# Altium PCB PCB.PcbDoc (part 3 of 5)
Units mm, origin at the board's own origin, x right, y up, seen from the top; angles counter-clockwise.
Board outline 101.6 x 53.34 mm, 6 copper layers (Top Layer, Int1 (GND), Int2, Int3, Int4 (GND), Bottom Layer), stack 1.625 mm thick; 228 components, 228 nets, 1016 pads, 995 vias.
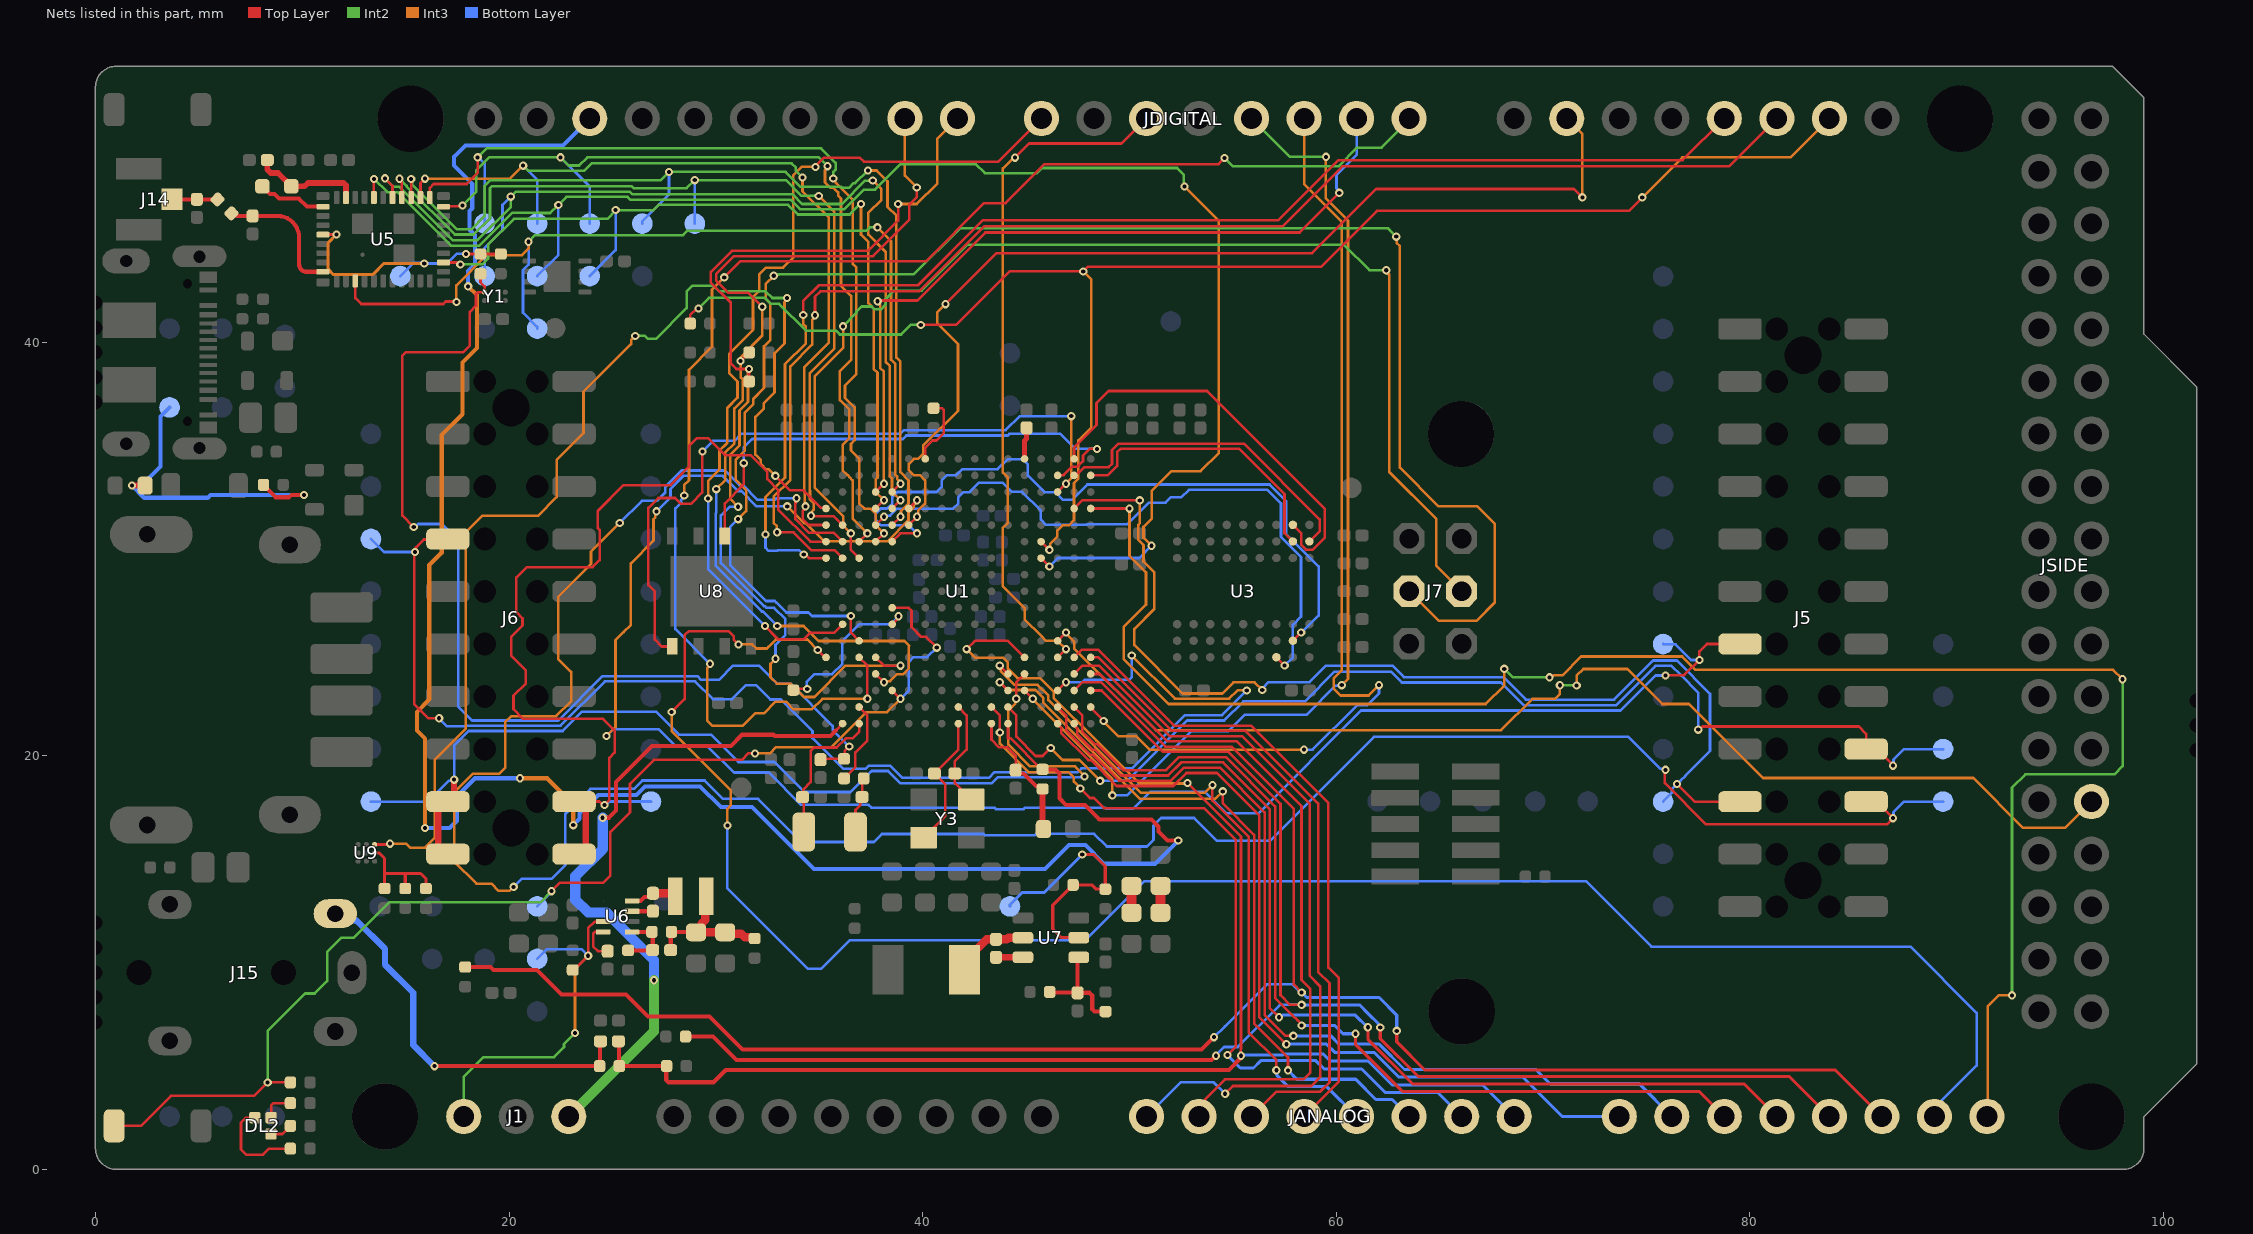
[diagram p7: the nets of this part, all layers, seen from the top]

## Via types
v1: diameter 0.4, hole 0.2, Top Layer to Bottom Layer, tented both sides, 995 vias

## Nets (pads, with @x,y where several pads share a name; then routed paths per layer and width w, separated by ;. In a path a pad name is that pad's centre, name@x,y a point inside that pad or via, vN(x,y) a via of type N, cw(c..) or ccw(c..) an arc to the next point about the centre after c; other vN are vias at no path point) (continued)
LEFT: JANALOG.22 R25.1 U1.T3 | length 97.2
  Top Layer w0.127: U1.T3@47.326,23.153 47.726,23.553 48.615,23.553 51.732,20.436 54.943,20.436 57.946,17.433 57.946,8.933 v1(58.326,8.553)
  Top Layer w0.15: v1(62.924,6.696) 62.924,6.163 64.291,4.796 84.142,4.796 JANALOG.22@86.386,2.553
  Top Layer w0.2: R25.1@17.878,9.784 19.103,9.784 19.243,9.644 21.343,9.644 22.528,8.459 25.653,8.459 26.722,7.39 29.697,7.39 31.297,5.79 53.49,5.79 v1(54.09,6.39)
  Bottom Layer w0.127: v1(54.09,6.39) 54.611,6.911 56.644,8.943 57.888,8.943 58.278,8.553 v1(58.326,8.553)
  Bottom Layer w0.15: v1(58.326,8.553) 58.575,8.305 62.075,8.305 62.924,7.455 v1(62.924,6.696)
M_7: C4.1 J15.2 R22.2 | length 19
  Top Layer w0.2: v1@16.389,4.989 24.371,4.989 R22.2@24.376,4.994 ; R22.2@24.38,4.99 24.4,5.01 24.4,6.17 C4.1@24.42,6.19
  Bottom Layer w0.3: J15.2@11.6,12.363 12.247,12.363 12.588,12.022 12.635,12.022 14,10.657 14,9.9 15.367,8.533 15.367,6.01 v1(16.389,4.988)
MEMS_32.768kHz: C72.1 R6.2 R9.1 Y1.2 | length 50.5
  Top Layer w0.127: v1(15.39,31.059) 14.843,31.606 14.843,39.348 14.999,39.505 17.763,39.505 18.1,39.841 18.1,41.461 18.4,41.761 18.4,42.318 18.497,42.415 Y1.2@18.819,42.415 18.819,42.692 18.619,42.892 R9.1@18.619,43.31 ; C72.1@35.065,19.805 35.104,19.844 35.646,19.844 35.649,19.847 36.097,19.847 36.225,19.975 36.225,20.225 v1(36.45,20.45)
  Bottom Layer w0.127: v1(15.39,31.059) 15.457,31.059 15.601,31.203 16.75,31.203 17.541,30.411 17.541,22.374 18.212,21.704 22.382,21.704 24.524,23.846 29.103,23.846 29.278,23.67 30.141,23.67 30.823,24.352 32.08,24.352 32.949,23.482 33.61,23.482 35.646,21.447 35.646,21.254 v1(36.45,20.45)
MIC: C4.2 JANALOG.16 R22.1 R23.2 U1.N5 | length 78.3
  Top Layer w0.127: v1(42.126,25.153) 42.53,25.557 44.122,25.557 U1.N5@44.922,24.757 ; v1(52.812,18.677) 55.394,16.095 55.394,5.824 55.382,5.812 55.382,5.497 v1(55.39,5.49)
  Top Layer w0.2: C4.2@25.29,6.19 25.31,6.17 25.31,5.01 R22.1@25.33,4.99 27.532,4.99 27.6,4.921 27.6,4.326 27.717,4.209 29.878,4.209 30.478,4.809 54.809,4.809 55.371,5.371 v1@55.371,5.471
  Top Layer w0.3: v1@55.371,5.471 v1(55.39,5.49)
  Int3 w0.127: v1(42.126,25.153) 42.536,24.743 43.888,24.743 44.117,24.515 44.117,24.21 44.574,23.753 45.679,23.753 46.332,23.099 46.332,22.795 48.403,20.724 50.474,18.653 52.788,18.653 v1(52.812,18.677)
  Bottom Layer w0.15: v1(55.39,5.49) 55.43,5.53 57.415,5.53 57.457,5.573 59.374,5.573 59.707,5.239 61.54,5.239 62.702,4.077 67.081,4.077 JANALOG.16@68.606,2.553
Net3V3_EN_X: 3V3_EN.X J1.1 R30.2 U6.3 | length 18.2
  Top Layer w0.127: R30.2@23.178,9.679 v1(23.825,10.326) 23.825,10.662 23.825,11.658 24.146,11.979 U6.3@24.621,11.979
  Int2 w0.127: J1.1@17.806,2.553 17.806,4.457 18.772,5.423 22.172,5.423 22.655,5.906 22.655,6.054 v1(23.19,6.59)
  Int3 w0.127: v1(23.19,6.59) 23.19,9.691 v1(23.825,10.326)
  Bottom Layer w0.127: 3V3_EN.X@21.362,10.173 21.83,10.641 23.51,10.641 v1(23.825,10.326)
Net5V_EN_X: 5V_EN.X R35.2 R36.1 U7.2 | length 12.7
  Top Layer w0.15: U7.2@47.55,11.2 46.706,11.2 46.289,11.616 46.289,12.767 R36.1@47.275,13.753 48.181,13.753 48.387,13.547 R35.2@48.831,13.547 48.831,14.669 48.274,15.226 v1(47.718,15.226)
  Bottom Layer w0.15: 5V_EN.X@44.222,12.713 44.222,12.793 44.805,13.377 45.869,13.377 v1(47.718,15.226)
NetC20_1: C20.1 U7.6 | length 1.3
  Top Layer w0.3: C20.1@43.55,10.25 U7.6@44.85,10.25
NetC20_2: C20.2 L1.1 U7.5 | length 3.7
  Top Layer w0.4: L1.1@42.016,9.653 42.016,10.103 42.566,10.653 42.619,10.653 43.086,11.12 44.069,11.12 44.149,11.2 U7.5@44.85,11.2
NetC35_2: C35.2 U1.N17 | length 1.5
  Top Layer w0.25: U1.N17@44.926,34.353 44.926,35.227 45.026,35.327 C35.2@45.026,35.853
NetC36_2: C36.2 L4.2 R7.2 U1.L1 | length 6.6
  Top Layer w0.127: U1.L1@43.326,21.553 43.326,20.778 43.698,20.407 44.093,20.407 44.5,20 C36.2@44.5,19.3 ; L4.2@45.778,16.454 L4.2@45.8,16.476
  Top Layer w0.2: C36.2@44.5,19.3 44.658,19.142 44.883,19.142 45.485,18.54 45.65,18.54 R7.2@45.8,18.39
  Top Layer w0.3: L4.2@45.8,16.476 R7.2@45.8,18.39
NetC38_1: C38.1 R14.1 U5.41 | length 6.6
  Top Layer w0.2: R14.1@6.572,46.228 ccw(c6.881,46.538) 6.881,46.1 C38.1@7.6,46.1 8.807,46.1 cw(c8.807,45.06) 9.847,45.06 9.847,43.76 ccw(c10.207,43.76) 10.207,43.4 U5.41@11,43.4
NetC39_1: C39.1 J14.SIG R14.2 | length 2.2
  Top Layer w0.2: J14.SIG@3.731,46.932 ccw(c3.731,46.904) J14.SIG@3.703,46.904 C39.1@4.903,46.904 5.102,46.906 ccw(c5.129,47.104) 5.128,46.904 5.896,46.904 R14.2@5.9,46.9
NetC42_1: C42.1 L2.2 U5.31 | length 5.3
  Top Layer w0.28: C42.1@8.308,48.804 8.308,48.347 8.475,48.18 8.827,48.18 L2.2@9.475,47.532 10.107,47.532 10.271,47.696 11.999,47.696 12.115,47.58 U5.31@12.115,46.99
NetC43_1: C43.1 L3.1 U6.8 | length 2.3
  Top Layer w0.2: U6.8@25.871,12.979 26.359,12.979 26.547,13.168 26.726,13.168 C43.1@26.907,13.349
  Top Layer w0.4: C43.1@26.907,13.349 27.84,13.349 L3.1@27.988,13.201
NetC43_2: C43.2 U6.7 | length 1
  Top Layer w0.2: U6.7@25.871,12.479 C43.2@26.907,12.479
NetC47_1: C47.1 R15.1 R16.2 U6.5 | length 3.1
  Top Layer w0.2: R16.2@25.758,10.586 26.934,10.586 C47.1@26.947,10.599 26.947,11.439 R15.1@26.907,11.479 U6.5@25.871,11.479
NetC47_2: C47.2 C48.2 C49.2 L3.2 R15.2 R39.1 | length 7
  Top Layer w0.2: C47.2@27.817,10.599 27.817,11.439 R15.2@27.857,11.479 29.028,11.479 C49.2@29.045,11.462
  Top Layer w0.4: C49.2@29.045,11.462 C49.2@29.083,11.462 ; L3.2@29.488,13.201 29.488,12.053 29.317,11.882 29.317,11.695 C49.2@29.083,11.462 ; R39.1@31.874,11.162 31.819,11.217 31.399,11.217 31.222,11.394 30.519,11.394 C48.2@30.451,11.462 C49.2@29.083,11.462
NetC50_2: C50.2 U6.4 | length 2
  Top Layer w0.127: U6.4@24.621,11.479 24.154,11.479 24.079,11.404 24.079,10.758 24.292,10.546 C50.2@24.768,10.546
NetC51_1: C51.1 R8.1 Y2.2 | length 2.8
  Top Layer w0.127: Y2.2@36.75,16.31 36.75,17.378 36.982,17.61 36.982,17.912 C51.1@37.07,18 37.07,18.82 R8.1@37.15,18.9
NetC52_1: C52.1 U1.J2 Y3.3 | length 5.2
  Top Layer w0.127: U1.J2@41.726,22.353 42.126,21.953 42.126,20.302 41.556,19.732 C52.1@41.556,19.143 41.556,18.679 Y3.3@42.35,17.885
NetC53_1: C53.1 U1.C1 Y2.1 | length 7.2
  Top Layer w0.127: C53.1@34.195,18 34.25,17.945 Y2.1@34.25,16.31 ; C53.1@34.23,18 34.23,18.366 34.584,18.72 34.584,20.227 34.755,20.397 35.845,20.397 36.288,20.841 36.612,20.841 36.926,21.155 U1.C1@36.926,21.553
NetC54_1: C54.1 U1.J1 Y3.1 | length 6.7
  Top Layer w0.127: Y3.1@40.05,16.035 41.1,17.085 41.1,18.604 C54.1@40.561,19.143 41.726,20.308 U1.J1@41.726,21.553
NetC60_1: C60.1 C61.2 | length 1.3
  Top Layer w0.5: C60.1@51.5,12.403 C61.2@51.5,13.703
NetC65_1: C65.1 R31.2 R33.2 U7.1 | length 5.2
  Top Layer w0.2: R31.2@46.155,8.588 R31.2@46.142,8.575 46.162,8.555 47.472,8.555 C65.1@47.492,8.535 ; U7.1@47.55,10.25 47.492,10.192 C65.1@47.492,8.535 ; R33.2@48.842,7.625 48.317,7.625 48.2,7.742 48.2,8.4 48.065,8.535 C65.1@47.492,8.535
NetC68_1: C68.1 C69.2 | length 1.3
  Top Layer w0.5: C68.1@50.1,12.403 C69.2@50.1,13.703
NetDL1_C: DL1.C PWR_LED.X R10.2 | length 16.3
  Top Layer w0.2: R10.2@8.125,33.085 8.71,32.5 9.362,32.5 9.472,32.61 v1(10.086,32.61)
  Top Layer w0.3: v1(1.767,33.062) DL1.C@2.4,33.062
  Bottom Layer w0.2: PWR_LED.X@3.582,36.843 3.146,36.407 3.146,33.98 2.227,33.062 v1(1.767,33.062) 2.355,32.473 5.431,32.473 5.569,32.61 v1(10.086,32.61)
NetDL2_1: DL2.1 R12.1 | length 1.1
  Top Layer w0.15: DL2.1@8.495,1.705 9.045,1.705 R12.1@9.425,2.085
NetDL2_2: DL2.2 R13.1 | length 1.6
  Top Layer w0.127: DL2.2@8.495,2.495 8.495,3.095 8.6,3.2 R13.1@9.425,3.2
NetDL2_3: DL2.3 R11.1 | length 4.7
  Top Layer w0.127: DL2.3@7.705,2.495 7.273,2.495 7.037,2.259 7.037,0.963 7.29,0.71 8.11,0.71 8.4,1 R11.1@9.425,1
NetJ1_3: J1.3 U1.B1 | length 33.1
  Top Layer w0.127: 35.799,21.22 35.799,21.225 U1.B1@36.122,21.549
  Top Layer w0.2: v1(24.525,17) 24.527,17.002 24.825,17.002 25.166,17.343 25.166,18.728 26.913,20.475 30.733,20.475 31.271,21.013 32.79,21.013 32.845,20.959 35.537,20.959 35.799,21.22
  Int2 w0.5: J1.3@22.886,2.553 27.009,6.676 v1(27.009,9.139)
  Bottom Layer w0.5: v1(24.525,17) 24.525,15.486 23.207,14.167 23.207,13.037 23.823,12.421 24.705,12.421 27.009,10.116 v1(27.009,9.139)
NetJDIGITAL_3: JDIGITAL.3 R7.1 U1.M1 | length 97.4
  Top Layer w0.127: U1.M1@44.126,21.553 44.126,20.851 44.239,20.851 R7.1@45.75,19.34
  Top Layer w0.2: R7.1@45.75,19.34 46.414,19.34 46.611,19.143 46.611,17.943 46.942,17.613 47.842,17.613 48.542,16.913 51.063,16.913 51.412,16.564 51.412,16.327 51.841,15.898 52.36,15.898 v1(52.362,15.897)
  Int3 w0.2: v1(15.932,16.5) 15.932,20.823 15.542,21.213 15.542,22.113 16.142,22.713 16.142,29.213 16.742,29.813 16.742,35.513 17.742,36.513 17.742,39.013 18.442,39.713 18.442,42.276 v1(18.021,42.696) ; v1(20.529,18.91) 21.844,18.91 23.101,17.653 v1(23.101,16.64)
  Bottom Layer w0.2: v1(15.932,16.5) 17.129,16.5 17.471,16.842 17.471,18.032 18.349,18.91 v1(20.529,18.91) ; v1(18.021,42.696) 18.021,43.432 18.349,43.76 18.349,45.177 18.095,45.432 18.095,46.346 18.221,46.473 18.221,47.648 17.334,48.535 17.334,48.961 17.886,49.513 22.602,49.513 JDIGITAL.3@23.902,50.813 ; v1(23.101,16.64) 23.41,16.949 23.41,17.202 24.315,18.107 26.162,18.107 26.568,18.513 29.242,18.513 30.242,17.513 31.742,17.513 34.742,14.513 45.913,14.513 47.077,15.677 47.871,15.677 48.775,14.773 51.238,14.773 v1(52.362,15.897)
NetL2_1: L2.1 U5.34 | length 3.3
  Top Layer w0.2: L2.1@8.075,47.532 8.447,47.16 8.652,47.16 8.867,46.946 9.827,46.946 10.222,46.55 U5.34@11,46.55
NetLPO_IN_X: LPO_IN.X R9.2 R40.2 U5.37 | length 12.8
  Top Layer w0.127: v1(17.922,44.265) 17.925,44.263 18.616,44.263 R9.2@18.619,44.26 R40.2@19.6,44.26
  Top Layer w0.15: U5.37@11,45.2 v1(11.65,45.2)
  Int3 w0.15: v1(11.65,45.2) 11.248,44.798 11.248,43.56 11.273,43.535 11.273,43.496 11.508,43.26 13.4,43.26 13.94,43.8 v1(15.9,43.8)
  Bottom Layer w0.127: LPO_IN.X@14.742,43.193 15.382,43.833 15.867,43.833 v1(15.9,43.8) 15.909,43.791 15.917,43.8 17,43.8 17.465,44.265 v1(17.922,44.265)
NetR3_2: R3.2 U1.E7 | length 7.9
  Top Layer w0.127: R3.2@33.776,23.146 33.858,23.229 v1(34.416,23.229) ; U1.E7@38.526,26.353 38.779,26.606 38.779,26.688 v1(38.831,26.741)
  Bottom Layer w0.127: v1(34.416,23.229) 34.399,23.245 34.399,23.578 34.764,23.943 35.617,23.943 36.117,24.444 36.117,25.544 36.926,26.353 38.444,26.353 v1(38.831,26.741)
NetR5_2: R5.2 U1.G17 | length 3.4
  Top Layer w0.127: U1.G17@40.126,34.353 40.126,34.905 40.464,35.243 40.669,35.243 41.011,35.586 41.011,36.726 40.935,36.803 R5.2@40.526,36.803
NetR6_1: R6.1 R8.2 U1.C2 | length 4.1
  Top Layer w0.127: R8.2@36.2,18.9 36.748,19.448 36.748,20.158 37.326,20.737 37.326,21.953 U1.C2@36.926,22.353
NetR32_2: R32.2 R34.2 R37.2 U9.C2 | length 5.4
  Top Layer w0.15: U9.C2@13.5,15.3 13.507,15.293 13.725,15.293 13.98,15.038 13.98,14.307 ; R37.2@13.98,13.575 13.98,14.307 ; R34.2@14.98,13.575 14.98,14.307 ; R32.2@15.98,13.575 15.98,14.051 15.724,14.307 14.98,14.307 ; 13.98,14.307 14.98,14.307
PA0_C: JANALOG.20 U1.T1 | length 48.6
  Top Layer w0.127: U1.T1@47.326,21.553 47.326,21.494 47.472,21.348 47.472,21.296 47.472,21.046 48.224,20.294 48.343,20.294 49.595,19.043 51.873,19.043 52.505,19.674 54.527,19.674 56.793,17.408 56.793,7.786 v1(57.226,7.353)
  Top Layer w0.15: v1(61.527,6.866) 61.527,6.296 63.701,4.123 79.735,4.123 JANALOG.20@81.306,2.553
  Bottom Layer w0.15: v1(57.226,7.353) 57.294,7.353 57.396,7.455 60.924,7.455 61.513,6.866 v1(61.527,6.866)
PA1: J6.17 J6.19 POWER_EN.X U1.N4 | length 52.2
  Top Layer w0.127: v1(44.526,22.753) 44.526,23.553 U1.N4@44.922,23.949
  Top Layer w0.3: J6.19@17.042,15.239 16.926,15.239 16.574,15.591 16.574,17.427 16.926,17.779 17.342,17.779 17.342,18.839 v1(17.343,18.841)
  Int3 w0.127: v1(44.526,22.753) 44.474,22.701 44.474,22.511 44.141,22.178 44.141,20.537 45.195,19.482 47.368,19.482 47.831,19.02 v1(47.831,18.994)
  Bottom Layer w0.127: POWER_EN.X@13.322,17.779 16.072,17.779 17.09,18.796 17.299,18.796 v1(17.343,18.841) 17.343,20.499 18.04,21.196 22.593,21.196 23.524,22.127 27.108,22.127 28.22,21.015 29.763,21.015 31.085,19.692 32.83,19.692 34.278,18.245 36.512,18.245 37.528,19.26 38.329,19.26 38.915,18.674 43.346,18.674 43.625,18.953 47.79,18.953 v1(47.831,18.994)
PA1_C: JANALOG.19 U1.T2 | length 46.4
  Top Layer w0.127: U1.T2@47.326,22.353 47.726,21.953 47.726,21.151 48.329,20.548 48.448,20.548 49.7,19.297 51.768,19.297 52.399,19.928 54.673,19.928 57.047,17.554 57.047,8.28 57.883,7.443 57.888,7.443 58.117,7.215 58.117,7.21 58.326,7.001 v1(58.326,6.953)
  Top Layer w0.15: v1(60.926,6.553) 60.926,6.048 63.219,3.754 77.564,3.754 JANALOG.19@78.766,2.553
  Bottom Layer w0.15: v1(58.326,6.953) 59.929,6.953 60.329,6.553 v1(60.926,6.553)
PA2: JDIGITAL.15 U1.N3 | length 50.6
  Top Layer w0.127: U1.N3@44.926,23.153 v1(45.326,22.753)
  Int2 w0.127: JDIGITAL.15@55.906,50.813 57.759,48.96 v1(59.504,48.96)
  Int3 w0.127: v1(45.326,22.753) 45.326,22.723 49.173,18.876 v1(49.173,18.083) ; v1(59.504,48.96) 59.499,48.955 59.499,46.949 60.566,45.883 60.566,23.713 v1(60.266,23.413)
  Bottom Layer w0.127: v1(49.173,18.083) 49.891,18.083 53.004,21.196 54.792,21.196 55.574,21.978 58.553,21.978 59.966,23.39 60.243,23.39 v1(60.266,23.413)
PA3: JDIGITAL.16 U1.U2 | length 47.4
  Top Layer w0.127: U1.U2@48.126,22.353 48.126,22.328 48.751,21.703 v1(48.751,21.678)
  Int3 w0.127: v1(48.751,21.678) 48.751,21.652 49.457,20.946 50.316,20.946 50.969,20.293 v1(58.44,20.293) ; JDIGITAL.16@58.446,50.813 58.446,47.644 60.266,45.824 60.266,24.113 59.875,23.722 59.875,23.251 60.213,22.913 61.566,22.913 v1(62.066,23.413)
  Bottom Layer w0.127: v1(58.44,20.293) 58.849,20.293 60.992,22.437 61.486,22.437 62.066,23.017 v1(62.066,23.413)
PA4: JANALOG.21 R24.1 U1.U3 | length 81.4
  Top Layer w0.127: U1.U3@48.126,23.153 48.656,23.153 51.627,20.182 54.793,20.182 57.305,17.671 57.305,8.418 57.769,7.953 v1(58.326,7.953)
  Top Layer w0.15: v1(62.126,6.853) 62.126,6.32 63.957,4.488 81.91,4.488 JANALOG.21@83.846,2.553
  Top Layer w0.2: R24.1@28.535,6.419 29.868,6.419 30.997,5.29 53.966,5.29 v1@54.166,5.49
  Top Layer w0.3: v1@54.166,5.49 v1(54.19,5.49)
  Bottom Layer w0.127: v1(54.19,5.49) 54.19,5.531 54.574,5.915 55.236,5.915 57.274,7.953 v1(58.326,7.953)
  Bottom Layer w0.15: v1(58.326,7.953) 61.126,7.953 61.555,7.524 62.026,7.054 62.026,7.02 62.126,6.92 v1(62.126,6.853)
PA6: J6.7 PCLK.X U1.R3 | length 69.6
  Top Layer w0.127: v1(16.619,21.81) 16.095,21.81 15.413,22.492 15.413,29.813 15.502,29.902 15.502,30.079 15.876,30.452 J6.7@17.316,30.452 ; U1.R3@46.526,23.153 v1(46.926,23.553)
  Int3 w0.127: v1(50.11,24.842) 52.197,22.755 54.825,22.755 55.23,23.16 55.665,23.16 v1(55.672,23.153)
  Bottom Layer w0.127: PCLK.X@13.322,30.479 13.951,29.85 v1(15.45,29.85) ; v1(16.619,21.81) 16.619,21.808 17.007,21.42 17.904,21.42 17.934,21.45 22.487,21.45 24.629,23.592 28.997,23.592 29.854,22.735 30.789,22.735 31.463,23.409 31.945,23.409 32.634,22.72 33.151,22.72 34.675,21.196 34.675,20.851 36.152,19.374 37.251,19.374 37.396,19.519 38.429,19.519 39.021,18.928 43.198,18.928 43.477,19.207 47.492,19.207 47.669,19.385 50.115,19.385 52.688,21.958 54.477,21.958 v1(55.672,23.153) ; v1(46.926,23.553) 47.734,23.553 47.855,23.674 49.998,23.674 50.11,23.786 v1(50.11,24.842)
PA7: JDIGITAL.13 U1.R5 | length 33.5
  Top Layer w0.127: v1(44.461,48.919) 45.143,49.601 49.614,49.601 JDIGITAL.13@50.826,50.813 ; U1.R5@46.526,24.753 v1(46.926,25.153)
  Int3 w0.127: v1(44.461,48.919) 44.407,48.919 43.882,48.393 43.882,33.687 44.117,33.452 44.117,31.255 43.872,31.01 43.872,28.208 44.936,27.143 44.936,26.591 45.736,25.791 45.974,25.553 46.526,25.553 v1(46.926,25.153)
PA8: U1.E15 U5.3 UART7_RX.X | length 46.4
  Top Layer w0.127: U5.3@12.565,42.96 12.565,42.135 12.856,41.844 16.819,41.844 16.936,41.961 17.434,41.961 v1(17.453,41.943) ; U1.E15@38.526,32.753 v1(38.926,33.153)
  Int2 w0.127: v1(20.943,44.851) 21.265,45.173 28.415,45.173 28.63,45.388 37.284,45.388 37.444,45.548 v1(37.81,45.548)
  Int3 w0.127: v1(17.453,41.943) 17.453,42.749 18.907,44.204 20.63,44.204 20.943,44.516 v1(20.943,44.851) ; v1(37.81,45.548) 38.469,44.89 38.469,39.151 38.667,38.954 38.667,33.605 38.771,33.502 38.771,33.382 38.926,33.227 v1(38.926,33.153)
  Bottom Layer w0.127: v1(20.943,44.851) 20.943,43.751 20.671,43.479 20.671,41.427 21.362,40.737 UART7_RX.X@21.362,40.653
PA9: JDIGITAL.17 U1.D15 | length 38.1
  Top Layer w0.127: U1.D15@37.726,32.753 v1(38.126,33.153) ; v1(37.825,41.978) 37.856,42.009 39.742,42.009 43.033,45.3 58.227,45.3 v1(60.144,47.216)
  Int3 w0.127: v1(37.825,41.978) 37.825,41.904 37.944,41.785 37.944,38.751 38.126,38.568 v1(38.126,33.153)
  Bottom Layer w0.127: v1(60.144,47.216) 60.144,47.29 60.009,47.425 60.009,48.076 60.986,49.052 JDIGITAL.17@60.986,50.813
PA10: BLE_ON.X U1.D14 U5.14 | length 41.4
  Top Layer w0.127: U5.14@16.83,43.85 17.418,43.85 cw(c17.418,43.53) 17.483,43.843 cw(c17.418,43.53) v1(17.644,43.756) ; U1.D14@37.726,31.953 v1(38.126,32.353)
  Int2 w0.127: v1(17.644,43.756) 18.711,43.756 18.992,44.037 18.992,44.727 20.228,45.963 24.757,45.963 25.155,46.362 v1(25.155,46.386) 25.173,46.368 26.965,46.368 27.235,46.638 33.498,46.638 33.965,46.172 36.471,46.172 36.977,46.678 v1(37.016,46.678)
  Int3 w0.127: v1(37.016,46.678) 37.016,45.2 37.369,44.846 37.369,41.881 37.634,41.616 37.634,38.701 37.817,38.518 37.817,33.448 37.723,33.354 37.723,32.756 v1(38.126,32.353)
  Bottom Layer w0.127: BLE_ON.X@23.902,43.193 25.155,44.446 v1(25.155,46.386)
PA15: U1.A14 U9.C3 | length 55.1
  Top Layer w0.127: v1(32.878,33.532) 33.571,32.838 34.224,32.838 35.079,31.983 35.296,31.983 U1.A14@35.326,31.953
  Top Layer w0.15: U9.C3@13.5,15.7 14.194,15.7 v1(14.24,15.746)
  Int2 w0.127: v1(26.1,40.3) 26.566,40.3 26.707,40.159 27.099,40.159 28.583,41.644 28.583,42.436 28.877,42.729 29.871,42.729 30.142,42.458 32.408,42.458 32.733,42.133 v1(33.438,42.133)
  Int3 w0.127: v1(14.24,15.746) 15.024,15.746 15.217,15.553 15.933,15.553 16.4,16.02 16.4,19.8 17.9,21.3 17.9,30.8 18.7,31.6 21.4,31.6 22.3,32.5 22.3,34.3 23.6,35.6 23.6,37.6 25.9,39.9 25.9,40.1 v1(26.1,40.3) ; v1(32.878,33.532) 32.564,33.846 32.434,33.846 32.172,34.107 32.172,34.3 31.906,34.567 31.906,36.375 32.316,36.786 32.316,37.05 32.838,37.572 32.838,39.459 33.32,39.941 33.32,41.941 33.438,42.059 v1(33.438,42.133)
PB0: JANALOG.11 U1.U5 | length 32.1
  Top Layer w0.127: U1.U5@48.126,24.753 48.493,24.753 52.048,21.198 55.611,21.198 59.122,17.687 59.122,9.551 59.672,9 59.672,4.199 59.226,3.753 57.106,3.753 JANALOG.11@55.906,2.553
PB1: JANALOG.12 U1.T5 | length 31.6
  Top Layer w0.127: U1.T5@47.326,24.753 47.702,25.128 48.477,25.128 52.153,21.452 55.886,21.452 59.622,17.717 59.622,9.751 60.126,9.246 60.126,4.233 JANALOG.12@58.446,2.553
PB2: JSIDE.28 U1.R6 | length 57.8
  Top Layer w0.127: U1.R6@46.526,25.553 v1(46.926,25.953)
  Int2 w0.127: v1(70.812,23.408) 70.817,23.404 71.62,23.404 v1(71.625,23.399)
  Int3 w0.127: v1(46.926,25.953) 46.926,25.904 47.339,25.491 47.339,25.171 51.279,21.231 67.97,21.231 69.491,22.752 70.578,22.752 70.812,22.985 v1(70.812,23.408) ; v1(71.625,23.399) 71.625,23.868 71.95,24.193 74.076,24.193 75.77,22.499 77.055,22.499 80.635,18.919 90.805,18.919 93.215,16.509 95.25,16.509 JSIDE.28@96.52,17.779
PB3: J7.3 U1.C6 | length 80.8
  Top Layer w0.127: v1(36.526,26.753) 36.526,25.953 U1.C6@36.926,25.553
  Int2 w0.127: v1(32.802,43.208) 32.854,43.26 33.035,43.26 33.05,43.275 39.569,43.275 41.798,45.505 62.502,45.505 62.577,45.43 62.577,45.423 v1(62.9,45.1)
  Int3 w0.127: v1(31.076,31.438) 31.467,31.828 31.467,32.837 30.955,33.348 30.955,34.308 31.398,34.751 31.398,36.586 31.808,36.996 31.808,37.261 32.33,37.782 32.33,39.794 32.632,40.096 32.632,41.874 32.42,42.087 32.42,42.826 v1(32.802,43.208) ; v1(62.9,45.1) 62.918,45.082 62.918,44.8 63.072,44.646 63.072,33.936 64.954,32.054 66.827,32.054 67.664,31.216 67.664,27.396 66.797,26.529 64.949,26.529 J7.3@63.526,27.953
  Bottom Layer w0.127: v1(31.076,31.438) 30.69,31.052 30.69,29.224 32.433,27.482 32.846,27.482 32.921,27.407 32.924,27.407 33.407,26.924 34.48,26.924 34.651,26.753 v1(36.526,26.753)
PB4: JDIGITAL.11 U1.B7 | length 43.1
  Top Layer w0.127: v1(32.372,26.273) 33.017,25.628 34.247,25.628 34.563,25.943 35.717,25.943 U1.B7@36.126,26.353 ; v1@34.8,48.5 35.213,48.913 36.966,48.913 37.152,48.726 43.659,48.726 JDIGITAL.11@45.746,50.813
  Int3 w0.127: v1(29.626,32.438) 29.626,33.289 30.177,33.84 30.177,34.754 30.551,35.127 30.551,36.816 31.046,37.312 31.046,38.094 30.643,38.497 30.643,39.428 31.797,40.583 31.797,42.172 32.093,42.467 32.093,43.265 32.427,43.599 33.249,43.599 33.75,44.1 33.75,48.071 34.152,48.473 v1(34.822,48.473)
  Bottom Layer w0.127: v1(29.626,32.438) 29.626,29.018 v1(32.372,26.273)
PB5: JANALOG.23 U1.A5 | length 93.7
  Top Layer w0.127: v1(27.863,22.113) 28.495,22.745 28.495,25.828 28.692,26.025 30.608,26.025 30.871,25.762 30.871,25.601 v1(31.09,25.383) ; v1(34.926,25.113) 35.285,24.753 U1.A5@35.326,24.753
  Int3 w0.127: 27.863,21.913 27.863,21.19 30.719,18.333 30.719,17.595 30.559,17.434 v1(30.559,16.622) ; v1(31.09,25.383) 31.758,25.383 31.959,25.181 32.461,25.181 32.537,25.257 32.542,25.257 32.903,25.618 34.42,25.618 v1(34.926,25.113)
  Bottom Layer w0.127: v1(30.559,16.622) 30.559,13.587 34.455,9.691 35.094,9.691 36.487,11.084 47.881,11.084 50.727,13.931 72.083,13.931 75.244,10.77 87.764,10.77 90.969,7.565 90.969,5.021 88.926,2.978 JANALOG.23@88.926,2.553
PB7: JDIGITAL.18 U1.C5 | length 70.7
  Top Layer w0.127: v1(30.405,43.132) 31.176,43.903 40.157,43.903 42.973,46.72 44.013,46.72 45.9,48.606 54.306,48.606 v1(54.6,48.9) ; U1.C5@36.926,24.753 37.326,24.353 v1(37.326,22.753)
  Int2 w0.127: v1(54.6,48.9) 55,48.5 60.1,48.5 61,49.4 62.19,49.4 63.526,50.735 JDIGITAL.18@63.526,50.813
  Int3 w0.127: v1(28.468,32.583) 28.468,33.086 28.698,33.316 28.698,38.66 29.816,39.778 29.816,42.543 v1(30.405,43.132) ; v1(29.718,24.446) 29.718,24.372 29.592,24.245 29.592,21.688 29.823,21.456 31.304,21.456 31.9,22.052 32.325,22.052 32.886,22.614 33.386,22.614 33.756,22.243 34.636,22.243 35.146,22.753 v1(37.326,22.753)
  Bottom Layer w0.127: v1(28.468,32.583) 28.468,32.517 28.315,32.364 28.315,32.227 28.041,31.954 28.041,26.122 v1(29.718,24.446)
PB8: JDIGITAL.10 R29.1 U1.D5 | length 49.7
  Top Layer w0.127: R29.1@31.61,38.098 31.605,38.104 31.605,38.695 v1(31.6,38.7) 30.99,38.7 30.723,38.967 30.723,41.903 29.76,42.865 29.76,43.399 30.773,44.411 37.35,44.411 38.816,45.878 v1(38.816,46.678) ; U1.D5@37.726,24.753 38.126,24.353 v1(38.926,24.353)
  Int3 w0.127: v1(31.076,32.038) 30.701,32.413 30.701,34.559 31.144,35.002 31.144,36.691 31.554,37.102 31.554,38.654 v1(31.6,38.7) ; v1(32.885,24.689) 32.642,24.445 32.642,23.79 32.949,23.482 33.61,23.482 34.254,22.838 34.764,22.838 36.278,24.353 v1(38.926,24.353) ; v1(38.816,46.678) 39.709,46.678 40.709,47.678 40.709,49.84 JDIGITAL.10@41.682,50.813
  Bottom Layer w0.127: v1(31.076,32.038) 30.667,32.038 30.242,31.613 30.242,29.314 32.328,27.228 32.376,27.228 32.451,27.153 32.819,27.153 33.362,26.609 33.362,25.837 32.885,25.36 v1(32.885,24.689)
PB9: JDIGITAL.9 R28.1 U1.D4 | length 47
  Top Layer w0.127: v1(31.187,39.09) 31.202,39.09 R28.1@31.61,39.498 ; v1(32.242,41.713) 31.561,42.393 30.592,42.393 30.014,42.97 30.014,43.294 30.878,44.157 37.596,44.157 39.349,45.91 39.349,46.641 39.716,47.009 v1(39.716,47.478) ; U1.D4@37.726,23.953 v1(38.126,23.553)
  Int3 w0.127: v1(30.017,32.888) 30.447,33.318 30.447,34.664 30.89,35.107 30.89,36.796 31.3,37.207 31.3,38.199 31.21,38.29 31.21,39.275 32.242,40.307 v1(32.242,41.713) ; v1(32.972,26.273) 34.242,26.273 34.971,25.544 39.123,25.544 39.344,25.323 39.336,25.315 39.336,24.762 39.336,24.21 39.069,23.943 38.764,23.943 38.426,23.605 38.178,23.605 v1(38.126,23.553) ; JDIGITAL.9@39.142,50.813 39.142,48.052 v1(39.716,47.478)
  Bottom Layer w0.127: v1(30.017,32.888) 30.017,31.748 29.988,31.718 29.988,29.208 32.222,26.974 32.271,26.974 v1(32.972,26.273)
PB10: U1.P11 U5.28 WIFI_ON.X | length 74.9
  Top Layer w0.127: U5.28@13.465,46.99 v1(13.465,47.89) ; U1.P11@45.726,29.553 v1(46.126,29.153)
  Int2 w0.127: v1(13.465,47.89) 13.479,47.89 14.113,47.256 14.602,47.256 17.194,44.664 18.565,44.664 20.15,46.249 21.613,46.249 21.62,46.242 21.991,46.242 v1(22.382,46.633) 22.772,47.023 25.727,47.023 25.858,46.892 33.604,46.892 34.07,46.426 36.212,46.426 37.154,47.368 37.695,47.368 38.94,48.613 42.566,48.613 43.006,48.173 45.526,48.173 45.771,48.418 52.302,48.418 52.628,48.092 52.628,47.559 v1(52.663,47.524)
  Int3 w0.127: v1(51.071,30.153) 50.681,30.543 50.681,31.062 51.071,31.453 51.071,32.8 52.028,33.757 53.436,33.757 54.324,34.645 54.324,45.863 v1(52.663,47.524)
  Bottom Layer w0.127: WIFI_ON.X@21.362,43.193 22.382,44.213 v1(22.382,46.633) ; v1(46.126,29.153) 46.536,29.562 50.481,29.562 v1(51.071,30.153)
PB11: JDIGITAL.25 R19.1 U1.P12 | length 76.1
  Top Layer w0.127: R19.1@28.76,40.898 28.76,41.308 29.082,41.63 v1(29.156,41.63) ; v1(39.91,40.83) 41.622,40.83 44.209,43.417 v1(47.767,43.417) 48.002,43.652 59.28,43.652 61.973,46.344 74.144,46.344 v1(74.8,47) ; U1.P12@45.726,30.353 v1(46.126,29.953)
  Int2 w0.127: v1(29.156,41.63) 29.665,42.139 32.368,42.139 32.661,41.846 33.055,41.846 34.351,40.55 35.81,40.55 35.994,40.367 38.958,40.367 39.422,40.83 v1(39.91,40.83)
  Int3 w0.127: v1(46.126,29.953) 46.178,30.005 46.178,30.253 46.517,30.591 46.517,30.896 46.764,31.143 47.069,31.143 47.317,31.391 47.317,33.188 47.528,33.399 47.528,35.245 48.154,35.871 48.154,43.031 v1(47.767,43.417) ; v1(74.8,47) 76.732,48.932 81.965,48.932 JDIGITAL.25@83.846,50.813
PB12: J5.19 PB12.X U1.T14 | length 52.5
  Top Layer w0.127: U1.T14@47.326,31.953 47.726,32.353 50.496,32.353 v1(50.501,32.348) ; v1(76.482,18.633) 77.336,17.779 J5.19@79.525,17.779
  Int3 w0.127: v1(50.501,32.348) 50.501,31.242 50.427,31.168 50.427,30.438 50.681,30.184 50.681,29.383 51.204,28.86 51.204,27.106 50.236,26.138 50.236,25.341 52.568,23.009 54.491,23.009 55.032,23.55 56.044,23.55 v1(56.422,23.173)
  Bottom Layer w0.127: v1(56.422,23.173) 56.422,23.247 56.735,23.56 58.704,23.56 59.501,24.357 62.712,24.357 63.271,23.798 68.081,23.798 69.165,22.713 73.435,22.713 75.323,24.602 76.466,24.602 78.074,22.993 78.074,20.226 76.879,19.03 76.879,19.027 76.651,18.798 76.647,18.798 v1(76.482,18.633) 76.236,18.388 76.236,18.21 PB12.X@75.805,17.779
PB13: JANALOG.24 U1.U14 | length 88.1
  Top Layer w0.127: U1.U14@48.126,31.953 49.996,31.953 v1(50.001,31.948)
  Int2 w0.127: v1(68.125,24.199) 68.537,23.787 v1(70.316,23.787) ; v1(92.677,8.41) 92.677,18.451 93.325,19.099 97.625,19.099 98.025,19.499 v1(98.025,23.699)
  Int3 w0.127: v1(50.001,31.948) 50.001,29.662 50.8,28.863 50.8,27.307 49.719,26.226 49.719,24.68 51.899,22.501 67.227,22.501 68.125,23.399 v1(68.125,24.199) ; v1(70.316,23.787) 70.39,23.787 70.492,23.89 70.929,23.89 71.838,24.799 76.725,24.799 77.371,24.153 97.571,24.153 v1(98.025,23.699) ; JANALOG.24@91.466,2.553 91.499,2.586 91.499,7.873 92.036,8.41 v1(92.677,8.41)
PC0: JANALOG.15 U1.L2 | length 38.8
  Top Layer w0.127: U1.L2@43.326,22.353 43.732,21.947 v1(43.732,21.126) ; v1(47.625,18.418) 48.089,17.954 48.278,17.954 48.77,17.462 53.601,17.462 55.14,15.924 55.14,5.929 v1(54.736,5.525)
  Int3 w0.127: v1(43.732,21.126) 43.732,20.587 45.111,19.208 47.05,19.208 47.311,18.946 47.311,18.753 47.625,18.439 v1(47.625,18.418)
  Bottom Layer w0.15: v1(54.736,5.525) 55.36,4.9 56.001,4.9 56.354,5.253 59.017,5.253 59.419,4.85 61.229,4.85 62.36,3.719 64.899,3.719 JANALOG.15@66.066,2.553
PC1: DFSDM1_DATIN0.X J5.18 U1.M2 | length 54.9
  Top Layer w0.127: U1.M2@44.126,22.353 44.526,21.953 44.526,20.923 45.466,19.983 45.805,19.983 v1(46.192,20.37) ; v1(77.504,21.26) 77.56,21.26 77.715,21.415 85.269,21.415 85.625,21.059 J5.18@85.625,20.319 ; J5.18@86.145,20.319 v1@86.925,19.539
  Int3 w0.127: v1(46.192,20.37) 46.768,19.794 47.584,19.794 48.583,18.794 v1(48.583,18.784)
  Bottom Layer w0.127: v1(48.583,18.784) 49.873,18.784 52.793,21.704 54.582,21.704 55.507,22.629 58.486,22.629 59.923,24.066 62.644,24.066 63.171,23.538 67.969,23.538 69.07,22.437 73.517,22.437 75.428,24.348 76.208,24.348 76.66,23.896 77.504,23.052 v1(77.504,21.26) ; v1(86.925,19.519) 86.946,19.54 86.946,19.819 87.446,20.319 DFSDM1_DATIN0.X@89.345,20.319 DFSDM1_DATIN0.X@89.327,20.3
PC2: JANALOG.14 U1.M3 | length 35.5
  Top Layer w0.127: v1(43.726,23.553) U1.M3@44.126,23.153 ; v1(54.512,18.277) 54.512,17.695 56.031,16.177 56.031,7.047 57.666,5.411 v1(57.666,4.784)
  Int3 w0.127: v1(43.726,23.553) 44.104,23.175 45.456,23.175 45.824,22.807 45.824,22.584 50.489,17.92 54.155,17.92 v1(54.512,18.277)
  Bottom Layer w0.15: v1(57.666,4.784) 58.097,4.353 60.937,4.353 61.914,3.376 62.702,3.376 JANALOG.14@63.526,2.553
PC2_C: JANALOG.17 U1.R1 | length 41.4
  Top Layer w0.127: U1.R1@46.526,21.553 46.526,21.543 46.697,21.372 46.697,21.103 48.013,19.786 48.133,19.786 49.384,18.535 52.118,18.535 52.749,19.166 54.235,19.166 56.285,17.116 56.285,7.345 v1(57.585,6.045)
  Bottom Layer w0.15: v1(57.585,6.045) 57.592,6.051 58.093,6.051 58.095,6.053 59.526,6.053 59.926,5.653 61.826,5.653 63.009,4.47 69.009,4.47 70.926,2.553 JANALOG.17@73.686,2.553
PC3: JANALOG.13 U1.M4 | length 33.8
  Top Layer w0.127: v1(43.726,24.353) U1.M4@44.126,23.953 ; v1(54.012,18.577) 54.012,17.836 55.777,16.071 55.777,6.602 57.104,5.275 v1(57.104,4.787)
  Int3 w0.127: v1(43.726,24.353) 43.771,24.308 43.771,24.1 44.442,23.429 45.562,23.429 46.078,22.912 46.078,22.689 50.563,18.205 53.64,18.205 v1(54.012,18.577)
  Bottom Layer w0.15: v1(57.104,4.787) 57.142,4.749 57.142,4.523 57.671,3.994 59.545,3.994 JANALOG.13@60.986,2.553
PC3_C: JANALOG.18 U1.R2 | length 44.6
  Top Layer w0.127: U1.R2@46.526,22.353 46.926,21.953 46.951,21.929 46.951,21.208 48.119,20.04 48.238,20.04 49.489,18.789 52.013,18.789 52.644,19.42 54.381,19.42 56.539,17.262 56.539,7.45 57.536,6.453 v1@57.915,6.453
  Bottom Layer w0.15: v1(57.926,6.453) 58.158,6.453 58.16,6.455 58.945,6.455 58.949,6.451 59.734,6.451 60.134,6.051 62.073,6.051 63.3,4.824 69.643,4.824 70.333,4.134 74.644,4.134 JANALOG.18@76.226,2.553
PC4: JANALOG.9 U1.T4 | length 37.4
  Top Layer w0.127: U1.T4@47.326,23.953 47.726,24.353 48.534,24.353 51.943,20.944 55.435,20.944 58.722,17.658 58.722,9.351 59.226,8.846 59.226,4.453 58.8,4.027 55,4.027 v1(54.626,3.653)
  Bottom Layer w0.127: JANALOG.9@50.826,2.553 52.476,4.203 54.076,4.203 v1(54.626,3.653)
PC5: JANALOG.10 U1.U4 | length 32.5
  Top Layer w0.127: U1.U4@48.126,23.953 48.575,23.953 51.838,20.69 55.189,20.69 58.322,17.558 58.322,9.151 58.745,8.728 58.745,4.671 58.418,4.345 54.618,4.345 53.667,3.393 53.667,2.854 JANALOG.10@53.366,2.553
PC6: I2S2_MCK.X J5.13 U1.F14 | length 91.5
  Top Layer w0.127: U1.F14@39.326,31.953 v1(39.726,32.353) ; v1(75.925,23.878) 75.943,23.896 76.823,23.896 v1(77.56,24.633) 77.56,25.036 77.923,25.399 J5.13@79.525,25.399
  Int3 w0.127: v1(24.715,20.95) 25.149,21.384 25.149,25.588 25.539,25.979 25.891,26.331 25.891,29.304 26.985,30.398 26.985,31.437 27.074,31.526 27.074,31.763 v1(27.126,31.816) ; v1(33.454,32.058) 34.275,31.237 34.37,31.237 35.244,30.362 38.288,30.362 39.317,31.391 39.317,31.75 39.571,32.004 39.571,32.124 39.726,32.279 v1(39.726,32.353)
  Bottom Layer w0.127: v1(24.715,20.95) 25.044,21.28 27.237,21.28 28.088,20.428 29.631,20.428 30.875,19.184 32.561,19.184 34.124,17.621 37.39,17.621 37.529,17.483 43.473,17.483 43.54,17.416 44.883,17.416 44.958,17.491 48.819,17.491 48.872,17.439 50.186,17.439 51.003,18.256 53.655,18.256 54.698,17.213 56.238,17.213 61.208,22.183 73.744,22.183 75.439,23.878 v1(75.925,23.878) ; v1(27.126,31.816) 27.807,32.496 27.807,32.898 28.446,33.537 30.325,33.537 31.065,32.797 31.235,32.797 31.975,32.058 v1(33.454,32.058) ; I2S2_MCK.X@75.805,25.399 75.816,25.388 76.405,25.388 77.166,24.627 77.554,24.627 v1(77.56,24.633)
PC7: JDIGITAL.20 U1.F13 | length 50.6
  Top Layer w0.127: U1.F13@39.326,31.153 v1(39.726,31.553) ; v1(41.105,41.837) 43.568,44.3 58.828,44.3 61.93,47.402 71.498,47.402 v1(71.9,47)
  Int3 w0.127: v1(39.726,31.553) 39.778,31.605 39.778,31.853 40.117,32.191 40.117,33.315 39.869,33.562 39.564,33.562 39.331,33.796 39.331,34.11 39.573,34.352 39.782,34.352 40.024,34.594 40.024,34.994 41.708,36.679 41.708,39.907 40.712,40.902 40.712,41.444 v1(41.105,41.837) ; JDIGITAL.20@71.146,50.813 71.9,50.058 v1(71.9,47)
PC8: SDIO_D0.X U1.E13 U5.24 | length 48.4
  Top Layer w0.127: U5.24@15.265,46.99 v1(15.265,47.89) ; U1.E13@38.526,31.153 v1(38.926,31.553)
  Int2 w0.127: v1@15.26,47.885 15.304,47.84 15.304,47.631 17.48,45.455 18.184,45.455 18.822,46.093 18.822,47.55 19.104,47.833 27.341,47.833 27.741,48.233 33.365,48.233 34.08,47.518 36.046,47.518 36.105,47.459 36.428,47.459 36.657,47.688 36.739,47.688 37.347,48.295 v1(37.353,48.295)
  Int3 w0.127: v1(37.353,48.295) 37.773,48.295 38.298,47.771 38.298,46.544 38.723,46.118 38.723,39.257 38.921,39.059 38.921,33.711 39.317,33.315 39.317,32.191 38.951,31.826 38.951,31.578 v1(38.926,31.553)
  Bottom Layer w0.127: SDIO_D0.X@26.442,45.733 26.442,45.845 27.735,47.138 v1(27.735,48.227)
PC9: SDIO_D1.X U1.E14 U5.26 | length 49.4
  Top Layer w0.127: v1(14.002,47.918) 14.365,47.556 U5.26@14.365,46.99 ; U1.E14@38.526,31.953 v1(38.926,32.353)
  Int2 w0.127: v1(14.002,47.918) 14.411,47.51 14.708,47.51 17.299,44.918 18.459,44.918 20.082,46.54 v1(20.082,47.033) 20.326,47.277 25.832,47.277 25.954,47.155 33.7,47.155 34.175,46.68 36.091,46.68 37.221,47.81 v1(37.585,47.81)
  Int3 w0.127: v1(37.585,47.81) 37.6,47.81 38.003,47.406 38.003,46.883 37.378,46.258 37.378,45.197 38.215,44.36 38.215,39.046 38.413,38.849 38.413,33.5 38.517,33.396 38.517,32.762 v1(38.926,32.353)
  Bottom Layer w0.127: SDIO_D1.X@18.822,43.193 18.822,44.55 19.683,45.412 19.683,46.634 v1(20.082,47.033)
PC10: SDIO_D2.X U1.A13 U5.23 | length 42.1
  Top Layer w0.127: U5.23@15.715,46.99 15.715,47.684 v1(15.934,47.904) ; v1(34.34,32.058) 34.34,31.984 34.198,31.842 34.198,31.443 34.488,31.153 U1.A13@35.326,31.153
  Int2 w0.127: v1(20.682,48.533) 20.926,48.288 23.637,48.288 23.994,48.646 33.662,48.646 33.869,48.438 33.869,48.281 v1(34.191,47.959)
  Int3 w0.127: v1(15.934,47.904) 20.052,47.904 v1(20.682,48.533) ; v1(34.191,47.959) 34.191,47.289 35.465,46.014 35.465,39.977 34.278,38.79 34.278,32.738 34.3,32.716 34.3,32.098 v1@34.336,32.062
  Bottom Layer w0.127: v1(20.682,48.533) 21.362,47.853 SDIO_D2.X@21.362,45.733
PC11: SDIO_D3.X U1.B13 U5.25 | length 44.9
  Top Layer w0.127: v1(14.7,47.9) 14.7,47.826 14.815,47.711 U5.25@14.815,46.99 ; v1(34.6,31.6) 34.623,31.577 35.702,31.577 U1.B13@36.126,31.153
  Int2 w0.127: v1(14.7,47.9) 15.05,47.55 15.05,47.526 17.375,45.201 18.289,45.201 19.076,45.988 19.076,47.445 19.162,47.531 25.937,47.531 26.026,47.442 28.591,47.442 v1(28.982,47.833) 33.382,47.833 34.144,47.07 v1(34.976,47.07)
  Int3 w0.127: v1@34.607,31.607 34.652,31.652 34.652,31.818 34.73,31.897 34.73,32.22 34.554,32.397 34.554,32.821 34.532,32.844 34.532,38.487 35.719,39.675 35.719,46.325 34.976,47.068 v1(34.976,47.07)
  Bottom Layer w0.127: SDIO_D3.X@28.982,45.733 v1(28.982,47.833)
PC12: SDIO_CLK.X U1.C12 U5.20 | length 44.5
  Top Layer w0.127: U5.20@16.83,46.55 16.856,46.576 17.721,46.576 v1(17.747,46.602) ; U1.C12@36.926,30.353 v1(37.326,30.753)
  Int2 w0.127: v1(17.747,46.602) 18.416,47.271 18.416,48.315 19.034,48.933 v1(22.482,48.933) 22.872,48.542 23.391,48.542 23.782,48.933 34.979,48.933 v1(35.402,48.509)
  Int3 w0.127: v1(35.402,48.509) 35.402,48.435 35.279,48.312 35.279,47.717 35.535,47.461 35.688,47.461 35.917,47.232 35.917,47.079 36.054,46.942 36.054,42.719 36.543,42.231 36.543,39.142 35.992,38.591 35.992,37.201 36.452,36.74 36.452,35.356 36.14,35.044 36.14,34.42 36.136,34.415 36.136,33.791 36.364,33.562 36.378,33.562 36.452,33.488 36.452,33.474 36.615,33.312 36.615,31.464 v1(37.326,30.753)
  Bottom Layer w0.127: v1(22.482,48.933) 23.902,47.513 SDIO_CLK.X@23.902,45.733
PC13: BOOT0/PC13.X PB2.1 R4.1 U1.E3 U1.E8 | length 60.6
  Top Layer w0.127: PB2.1@0.9,2.1 2.2,2.1 3.65,3.55 7.675,3.55 v1(8.325,4.2) R4.1@9.425,4.2 ; v1(22.05,13.45) 22.464,13.864 24.555,13.864 24.901,14.21 24.901,16.308 25.848,17.255 25.848,18.64 27.008,19.8 31.252,19.8 31.563,20.111 v1(31.893,20.111) ; U1.E3@38.526,23.153 v1(38.926,22.753) ; U1.E8@38.526,27.153 39.326,27.153 39.462,27.017 39.462,26.217 39.932,25.747 40.161,25.747 v1(40.683,25.226)
  Int2 w0.127: v1(8.325,4.2) 8.325,6.686 10.139,8.5 10.6,8.5 11.2,9.1 11.2,10.5 11.9,11.2 12.494,11.2 14.203,12.909 21.509,12.909 v1(22.05,13.45)
  Int3 w0.127: v1(31.893,20.111) 32.611,20.111 32.913,20.413 35.584,20.413 37.28,22.108 38.282,22.108 v1(38.926,22.753)
  Bottom Layer w0.127: BOOT0/PC13.X@21.362,12.713 22.05,13.401 v1(22.05,13.45) ; v1(38.926,22.753) 39.336,23.162 39.336,24.541 39.558,24.762 40.22,24.762 v1(40.683,25.226)
PD0_5: U1.D13 U3.C9 | length 31.8
  Top Layer w0.127: U1.D13@37.726,31.153 v1(38.126,31.553) ; U3.C9@57.104,24.76 v1(57.504,24.36)
  Bottom Layer w0.127: v1(38.126,31.553) 38.178,31.605 38.426,31.605 38.764,31.943 41.469,31.943 41.726,32.201 41.726,32.505 41.969,32.748 42.274,32.748 42.728,33.203 43.871,33.203 44.317,32.757 44.806,32.757 45.717,31.846 45.717,31.41 45.964,31.162 47.92,31.162 47.955,31.197 49.91,31.197 50.947,32.235 51.741,32.235 51.996,32.49 52.504,32.49 52.872,32.858 56.671,32.858 57.326,32.203 57.326,30.574 58.294,29.606 58.294,28.832 ; v1(57.504,24.36) 57.9,24.756 57.9,26.332 58.293,26.725 58.293,28.832
PD1_5: U1.E12 U3.B8 | length 34.9
  Top Layer w0.127: U1.E12@38.526,30.353 38.926,30.753 v1(39.726,30.753) ; U3.B8@57.904,25.56 v1(58.304,25.96)
  Bottom Layer w0.127: v1(39.726,30.753) 39.336,31.143 37.983,31.143 37.736,31.391 37.736,31.715 37.974,31.953 38.278,31.953 38.531,32.205 38.531,32.51 38.772,32.751 40.676,32.751 40.92,32.995 40.92,33.299 41.183,33.562 41.624,33.562 41.919,33.857 43.629,33.857 44.116,34.343 44.817,34.343 45.086,34.075 45.086,33.543 45.886,32.743 46.424,32.743 46.797,32.371 47.218,32.371 47.96,33.113 52.368,33.113 ; 52.368,33.112 56.776,33.112 57.58,32.308 57.58,30.721 59.15,29.151 59.15,26.782 58.328,25.96 v1(58.304,25.96)
PD2: SDIO_CMD.X U1.D12 U5.22 | length 45.3
  Top Layer w0.127: U5.22@16.165,46.99 16.165,47.454 16.356,47.645 17.945,47.645 18.482,48.182 v1(18.482,48.933) ; U1.D12@37.726,30.353 v1(38.126,30.753)
  Int2 w0.127: v1(18.482,48.933) 18.918,49.369 35.095,49.369 35.793,48.671 35.793,48.347 35.677,48.232 v1(35.677,47.916)
  Int3 w0.127: v1(35.677,47.916) 35.677,47.842 35.81,47.709 35.81,47.698 36.625,46.882 36.625,43.774 36.797,43.602 36.797,38.451 36.246,37.9 36.246,37.306 36.714,36.838 36.714,35.258 36.536,35.08 36.536,34.757 36.926,34.366 36.926,32.201 37.179,31.948 37.483,31.948 37.736,31.696 37.736,31.143 v1(38.126,30.753)
  Bottom Layer w0.127: v1(18.482,48.933) 18.52,48.933 18.822,48.631 SDIO_CMD.X@18.822,45.733
PD3: DFSDM1_CKOUT.X J5.20 U1.B12 | length 121.7
  Top Layer w0.127: v1(33.901,32.448) 33.848,32.396 33.848,32.203 33.845,32.199 33.845,31.437 34.504,30.777 35.702,30.777 U1.B12@36.126,30.353 ; v1(75.925,19.316) 75.888,19.279 75.888,18.674 77.883,16.679 86.625,16.679 v1(86.925,16.979) ; J5.20@86.145,17.779 v1@86.925,16.999
  Int3 w0.127: v1(20.22,13.659) 20.207,13.659 20.009,13.461 19.488,13.461 19.14,13.809 18.419,13.809 17.348,14.88 17.348,18.224 18.243,19.119 19.518,19.119 19.812,19.413 19.812,21.618 20.106,21.913 22.279,21.913 22.998,22.631 22.998,24.053 22.377,24.674 22.377,27.683 23.965,29.271 23.965,29.865 v1(25.35,31.25)
  Bottom Layer w0.127: v1(20.22,13.659) 20.614,14.053 22.067,14.053 22.711,14.696 22.711,17.169 23.94,18.398 26.042,18.398 26.448,18.803 29.46,18.803 30.349,17.914 32.035,17.914 34.125,15.824 37.641,15.824 38.03,16.213 42.947,16.213 43.014,16.146 45.409,16.146 45.484,16.221 48.293,16.221 48.905,15.61 50.842,15.61 51.164,15.931 51.164,16.37 51.164,16.494 51.164,16.62 51.529,16.986 51.655,16.986 53.129,16.986 54.228,15.886 56.787,15.886 61.814,20.913 74.127,20.913 75.675,19.364 75.877,19.364 v1(75.925,19.316) ; v1(25.35,31.25) 26.428,32.328 27.148,32.328 27.553,32.733 27.553,33.003 28.341,33.791 30.43,33.791 31.14,33.082 31.31,33.082 32.019,32.372 32.859,32.372 32.935,32.448 v1(33.901,32.448) ; v1(86.925,16.979) 86.946,17 86.946,17.279 87.446,17.779 DFSDM1_CKOUT.X@89.345,17.779
PD4: J6.18 J6.20 PWDN.X U1.A12 | length 46
  Top Layer w0.127: J6.18@23.358,17.779 23.367,17.788 24.369,17.788 24.54,17.617 v1(24.614,17.617) 24.847,17.85 24.847,19.899 25.105,20.157 25.105,21.222 24.544,21.783 20.683,21.783 20.217,22.25 20.217,22.902 20.809,23.495 20.809,24.13 20.1,24.839 20.1,25.744 20.651,26.294 20.651,26.642 20.354,26.938 20.354,28.615 20.86,29.121 24.046,29.121 24.383,29.458 24.383,30.918 24.288,31.013 24.288,31.839 25.53,33.081 27.805,33.081 28.704,33.981 28.704,34.98 29.082,35.358 29.616,35.358 30.437,34.537 31.665,34.537 32.487,33.715 32.487,33.37 33.013,32.845 33.013,31.909 34.569,30.353 U1.A12@35.326,30.353
  Top Layer w0.3: J6.20@23.142,15.239 23.358,15.239 23.71,15.591 23.71,17.427 23.358,17.779 J6.18@23.142,17.779
  Bottom Layer w0.127: v1(24.614,17.617) 24.688,17.617 24.859,17.788 26.853,17.788 PWDN.X@26.862,17.779
PD5: JDIGITAL.23 U1.A11 | length 64.1
  Top Layer w0.127: v1(34.223,41.308) 34.223,41.982 34.99,42.749 39.764,42.749 42.914,45.9 57.2,45.9 60.102,48.802 76.755,48.802 JDIGITAL.23@78.766,50.813 ; v1(34.252,29.724) 34.326,29.724 34.498,29.553 U1.A11@35.326,29.553
  Int3 w0.127: v1(32.4,30.7) 32.4,32.502 33.346,33.448 33.346,38.935 34.355,39.944 34.355,40.747 34.223,40.879 v1(34.223,41.308)
  Bottom Layer w0.127: v1(32.4,30.7) 32.4,30.061 32.552,29.91 32.923,29.91 32.931,29.917 32.969,29.917 32.986,29.934 34.038,29.934 34.247,29.724 v1(34.252,29.724)
PD6: JDIGITAL.24 U1.B11 | length 66
  Top Layer w0.127: v1(32.965,30.803) 33.76,30.803 34.634,29.929 35.75,29.929 U1.B11@36.126,29.553 ; v1(34.794,41.296) 34.794,42.194 35.053,42.453 39.827,42.453 42.974,45.6 57.4,45.6 60.302,48.502 78.995,48.502 JDIGITAL.24@81.306,50.813
  Int3 w0.127: v1(32.965,30.803) 32.951,30.817 32.951,31.103 32.797,31.257 32.797,32.54 33.6,33.343 33.6,38.83 34.652,39.883 34.652,41.081 34.794,41.222 v1(34.794,41.296)
PD7: J7.4 U1.C11 | length 58.4
  Top Layer w0.127: v1(36.526,30.753) 36.526,29.953 U1.C11@36.926,29.553
  Int2 w0.127: v1(36.152,40.761) 36.787,41.396 36.787,41.46 37.049,41.721 37.529,41.721 37.663,41.587 37.986,41.587 38.215,41.816 38.215,42.088 38.618,42.491 39.946,42.491 42.154,44.699 60.381,44.699 61.602,43.478 v1(62.416,43.478)
  Int3 w0.127: v1(36.152,40.761) 36.152,39.723 34.786,38.357 34.786,32.949 36.166,31.569 36.166,31.114 v1(36.526,30.753) ; v1(62.416,43.478) 62.416,43.404 62.563,43.257 62.563,33.726 64.842,31.447 64.842,29.177 J7.4@66.066,27.953
PD8_5: U1.U16 U3.B2 | length 13.7
  Top Layer w0.127: U1.U16@48.126,33.553 48.949,33.553 49.408,34.012 49.408,34.676 49.571,34.838 55.313,34.838 57.499,32.652 57.499,30.764 U3.B2@57.904,30.36
PD9_5: U1.T17 U3.B1 | length 20.8
  Top Layer w0.127: U1.T17@47.326,34.353 47.326,34.91 48.408,35.991 48.408,37.054 48.988,37.634 53.757,37.634 59.451,31.941 59.451,30.548 58.868,29.964 58.54,29.964 58.308,30.196 58.308,30.755 U3.B1@57.904,31.16
PD10_5: U1.T16 U3.A2 | length 15.7
  Top Layer w0.127: U1.T16@47.326,33.553 47.388,33.553 47.559,33.723 47.587,33.723 47.816,33.953 48.99,33.953 49.154,34.117 49.154,34.781 49.466,35.092 55.527,35.092 59.197,31.423 59.197,30.853 U3.A2@58.704,30.36
PD11_5: U1.R15 U8.5 | length 35.1
  Top Layer w0.127: U8.5@27.891,25.283 27.377,25.283 27.049,25.612 27.049,27.941 26.736,28.254 26.736,31.977 27.221,32.462 28.029,32.462 28.299,32.192 28.81,32.192 29.336,32.718 29.336,33.936 29.343,33.943 29.343,34.707 v1(29.349,34.713) ; U1.R15@46.526,32.753 v1(46.926,33.153)
  Int3 w0.127: v1(46.926,33.153) 46.926,33.157 47.189,33.419 v1(47.189,36.42)
  Bottom Layer w0.127: v1(29.349,34.713) 29.858,35.222 30.895,35.222 31.241,35.569 38.936,35.569 39.107,35.74 44.015,35.74 44.696,36.42 v1(47.189,36.42)
PD12_5: U1.R16 U8.2 | length 24.9
  Top Layer w0.127: U8.2@30.431,30.623 30.431,31.748 30.431,32.204 31.346,33.119 v1(31.346,34.147) ; U1.R16@46.526,33.553 46.542,33.569 46.811,33.569 47.22,33.977 47.482,33.977 47.751,34.246 47.751,34.509 48.076,34.834 v1(48.433,34.834)
  Bottom Layer w0.127: v1(31.346,34.147) 31.346,34.915 31.745,35.314 39.041,35.314 39.212,35.486 44.12,35.486 44.198,35.563 46.662,35.563 47.391,34.834 v1(48.433,34.834)